# Altium PCB Lora_SensorNetworkNode_V0.1.PcbDoc
Units mm, origin at the board's own origin, x right, y up, seen from the top; angles counter-clockwise.
Board outline 91.95 x 56.9 mm, 2 copper layers (Top Layer, Bottom Layer); 40 components, 39 nets, 154 pads, 37 vias.
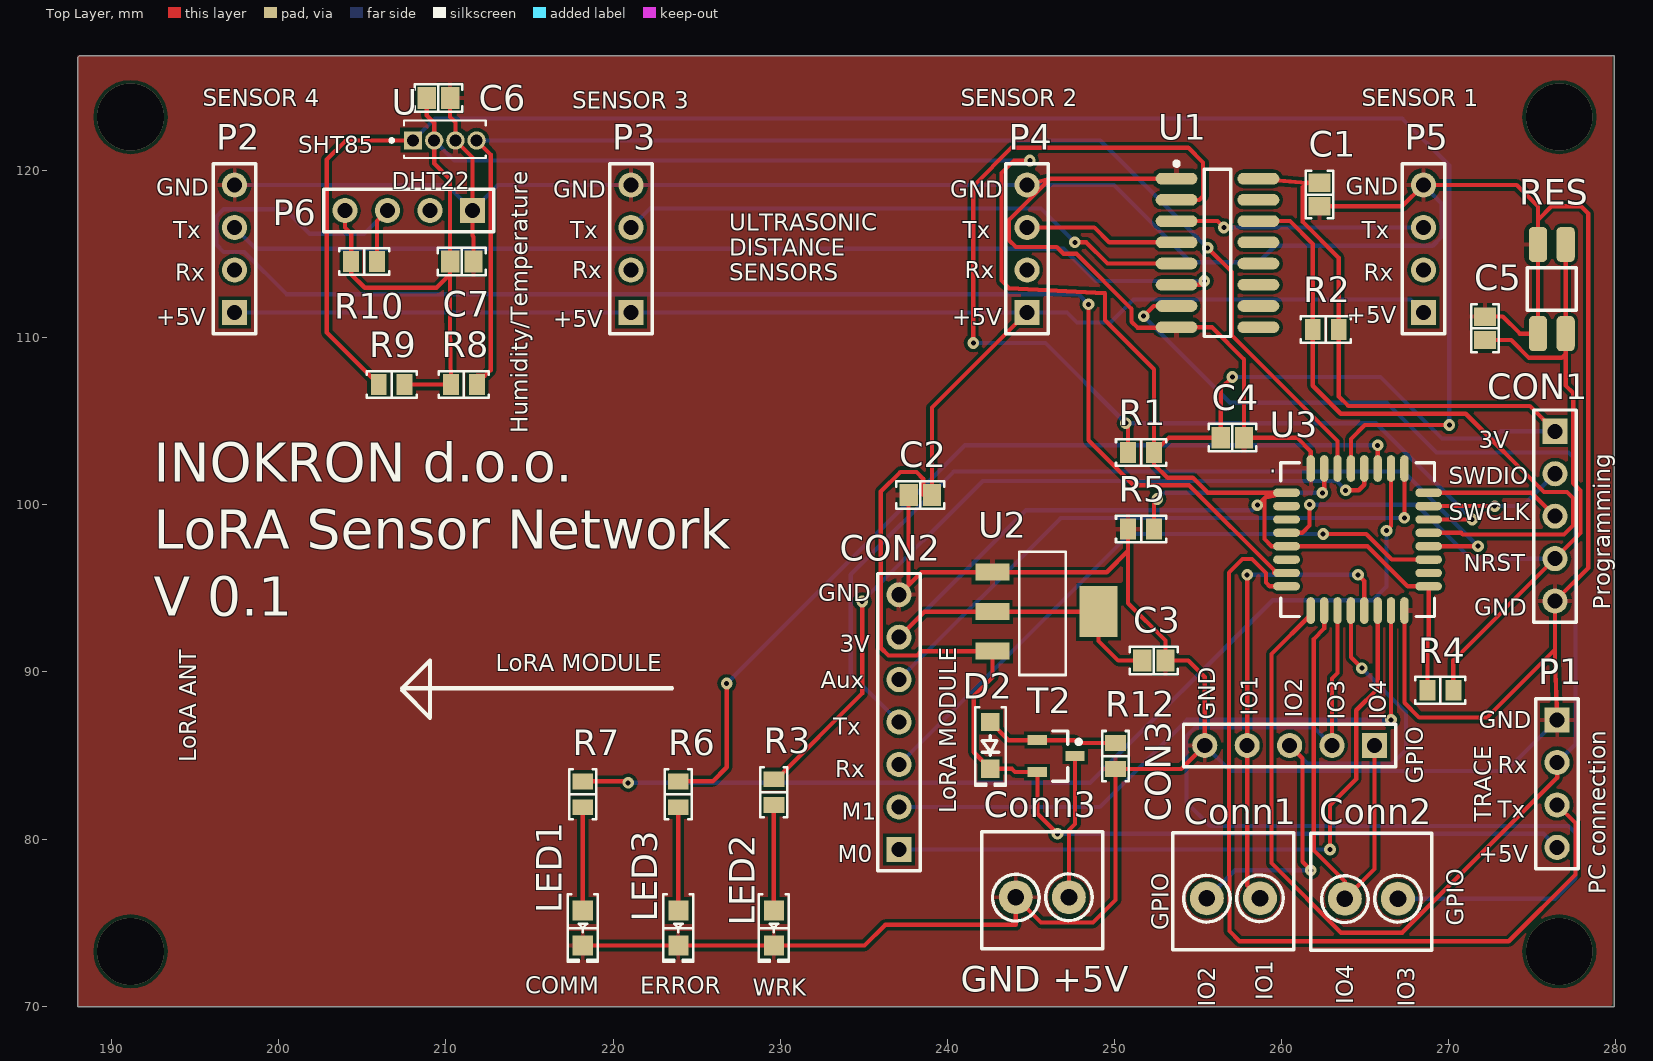
[diagram p0: Top Layer view]
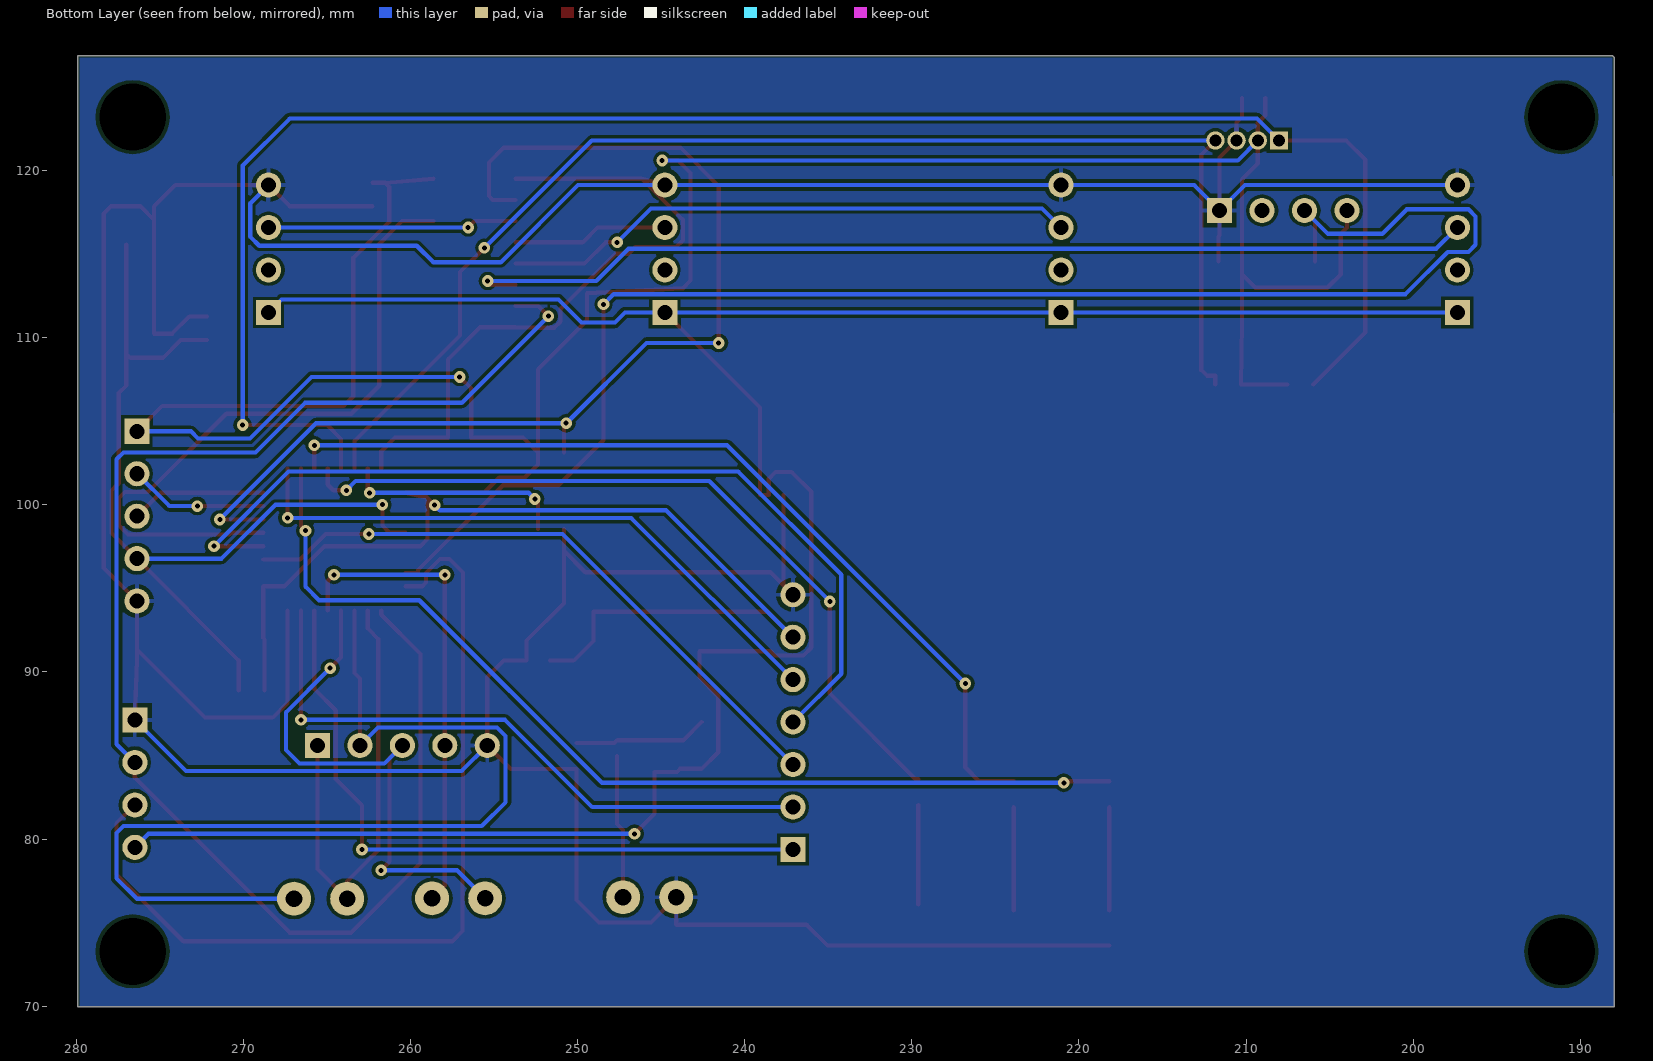
[diagram p1: Bottom Layer view, seen from below]
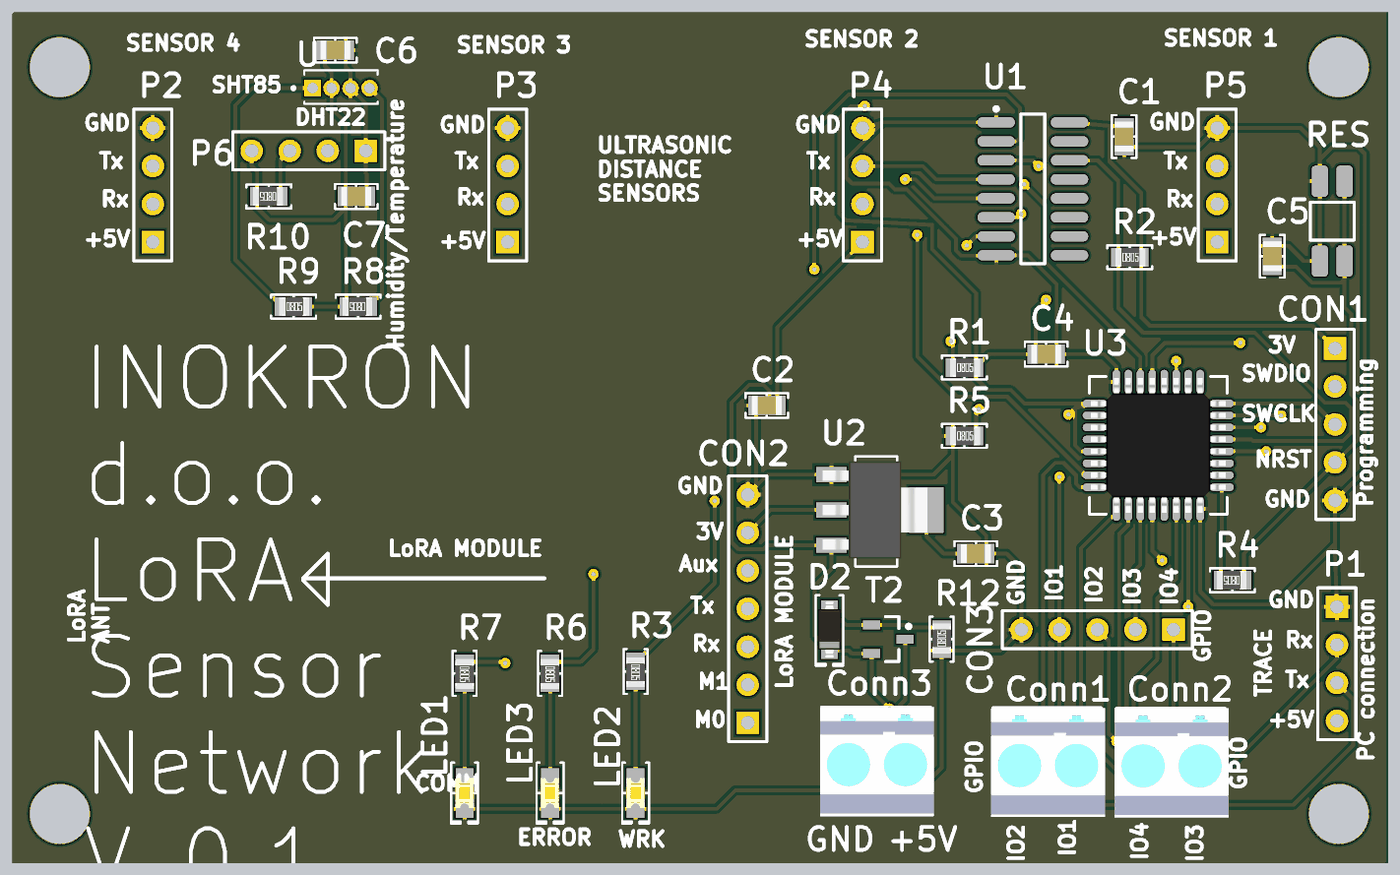
[diagram p2: 3D render of the assembled board from above, using the file's embedded part models]

## Layer stack, top to bottom
Top Solder: solder mask 0.0102, Solder Resist, Dk 3.5
Top Layer: signal copper 0.0356
Dielectric 1: dielectric 0.32, FR-4, Dk 4.8
Bottom Layer: signal copper 0.0356
Bottom Solder: solder mask 0.0102, Solder Resist, Dk 3.5

## Board outline
187.96,69.977 187.96,126.746 188.087,126.873 279.908,126.873 279.908,69.977

## Design rules (kind name [scope] priority, off if disabled: settings)
Clearance [All] p1: gap=0.2 ignorepadtopadclearanceinfootprint=FALSE
PolygonConnect [All] p1: connectstyle=Relief reliefconductorwidth=0.254 reliefentries=4 polygonreliefangle="90 Angle" airgapwidth=0.254
RoutingVias [All] p1: holewidth=0.3 width=0.7 viastyle="Through Hole" minholewidth=0.2 minwidth=0.6 maxholewidth=0.4 maxwidth=0.8
SolderMaskExpansion [All] p1: expansion=0.102
Width [All] p1: maxlimit=0.254 minlimit=0.2 preferedwidth=0.254 minimp=50.000000 maximp=50.000000 favimp=50.000000
30 further rules are at their usual default settings.

## Components (designator, comment, footprint, x,y, rotation, side; value= is the part's Value field where it differs from the comment)
C1 "0.1uF" "CAP 0805/2012 RF" 262.255,118.556 r90 top
C2 "0.1uF" "CAP 0805/2012 RF" 238.379,100.584 r0 top
C3 "0.1uF" "CAP 0805/2012 RF" 252.349,90.678 r180 top
C4 "0.1uF" "CAP 0805/2012 RF" 257.048,104.013 r180 top
C5 "0.1uF" "CAP 0805/2012 RF" 272.161,110.555 r270 top
C6 "0.1uF" "CAP 0805/2012 RF" 209.55,124.333 r180 top
C7 "0.1uF" "CAP 0805/2012 RF" 210.947,114.554 r180 top
CON1 "Header 2.54mm_5" HDR1X5 276.352,104.394 r270 top
CON2 "Header 2.54mm_7" HDR1X7 237.109,79.375 r90 top
CON3 "Header 2.54mm_5" HDR1X5 265.557,85.598 r180 top
Conn1 "GPIO 2" CON_TERM_BLOCK_31X2 255.27,76.429 r0 top value=IN1
Conn2 "GPIO 1" CON_TERM_BLOCK_31X2 263.525,76.403 r0 top value=IN1
Conn3 "+5V" CON_TERM_BLOCK_31X2 243.84,76.49 r0 top value=IN1
D2 "Diode Schottky" SOD-123W 242.57,85.598 r270 top
LED1 "Green" "LED 0805/2012 YELLOW" 218.186,74.676 r270 top
LED2 "Green" "LED 0805/2012 YELLOW" 229.616,74.676 r270 top
LED3 "Red" "LED 0805/2012 YELLOW" 223.901,74.676 r270 top
P1 "Header 4" HDR1X4 276.479,87.122 r270 top
P2 "Header 4" HDR1X4 197.358,111.506 r90 top
P3 "Header 4" HDR1X4 221.065,111.506 r90 top
P4 "Header 4" HDR1X4 244.771,111.506 r90 top
P5 "Header 4" HDR1X4 268.478,111.506 r90 top
P6 "Header 4" HDR1X4 211.582,117.602 r180 top
R1 "10K" "RES 0805/2012 RF" 251.587,103.124 r0 top
R2 "10K" "RES 0805/2012 RF" 262.636,110.49 r0 top
R3 "100" "RES 0805/2012 RF" 229.616,82.804 r270 top
R4 "10K" "RES 0805/2012 RF" 269.494,88.9 r180 top
R5 "10K" "RES 0805/2012 RF" 251.587,98.552 r0 top
R6 "100" "RES 0805/2012 RF" 223.901,82.677 r270 top
R7 "100" "RES 0805/2012 RF" 218.186,82.677 r270 top
R8 "10K" "RES 0805/2012 RF" 211.074,107.188 r180 top
R9 "10K" "RES 0805/2012 RF" 206.756,107.188 r0 top
R10 "10K" "RES 0805/2012 RF" 205.105,114.554 r180 top
R12 "100K 1%" "RES 0805/2012 RF" 250.063,84.963 r90 top
RES "TACTILE_SW_MICRO_CHINA" TACTILE_SW_2x3x4mm 277.495,113.03 r0 top
T2 "MOSFET P-CH SI2302CDS-T1-BE3" SOT23 246.507,84.963 r0 top
U "SHT85" XDCR_SHT85 209.931,121.793 r0 top
U1 "SN74HC153D" SO-16_m 256.159,115.062 r0 top
U2 "LD1117S50TR" SOT-223 245.872,93.599 r180 top
U3 "STM32F051K8Tx" TQFP_32pin 264.541,97.917 r0 top

## Footprints (in the part's own frame and the unit in brackets; to place one, negate y for a bottom-side part, rotate by r counter-clockwise, add the part's x,y. Pads: shape width x height; smd on the part's side, far side on the other; paste and mask are expansions set on the pad)
"CAP 0805/2012 RF" [mm] "Chip Capacitor, 2-Leads, Body 2.00x1.20mm, IPC High Density"
  rect 1.1x1.3 smd: 1(-0.7,0) 2(0.7,0)
  silkscreen extent -1.43,-0.82 1.43,0.82, body extent -1,-0.64 1,0.64, height 1.26
CON_TERM_BLOCK_31X2 [mil] "TerminalBlock 2way 3.1mm"
  round 80 hole 39.37: 1(10,0.99) 2(135,0.99)
  silkscreen extent -70,-120 215,155, body extent -75,-132 225,155, height 335
HDR1X4 [mm] "Connector; Header; 4 Position"
  rect 1.5x1.5 hole 0.9: 1(0,0)
  round 1.5 hole 0.9: 2(2.54,0) 3(5.08,0) 4(7.62,0)
  silkscreen extent -1.27,-1.27 8.89,1.27
HDR1X5 [mm] "Connector; Header; 5 Position"
  rect 1.5x1.5 hole 0.9: 1(0,0)
  round 1.5 hole 0.9: 2(2.54,0) 3(5.08,0) 4(7.62,0) 5(10.16,0)
  silkscreen extent -1.27,-1.27 11.43,1.27
HDR1X7 [mm] "Connector; Header; 7 Position"
  rect 1.5x1.5 hole 0.9: 1(0,0)
  round 1.5 hole 0.9: 2(2.54,0) 3(5.08,0) 4(7.62,0) 5(10.16,0) 6(12.7,0) 7(15.24,0)
  silkscreen extent -1.27,-1.27 16.51,1.27
"LED 0805/2012 YELLOW" [mm] "Chip Diode, 2-Leads, Body 2.00x1.25mm, IPC Medium Density"
  rect 1.2x1.2 smd: 1(-1.05,0) 2(1.05,0)
  silkscreen extent -2.03,-0.9 2.03,0.9, body extent -1,-0.62 1,0.63, height 0.9
"RES 0805/2012 RF" [mm] "Chip Resistor, 2-Leads, Body 2.00x1.25mm, IPC High Density"
  rect 0.95x1.25 smd: 1(-0.775,0) 2(0.775,0)
  silkscreen extent -1.5,-0.8 1.5,0.8, body extent -0.95,-0.62 1.05,0.63, height 0.6
SO-16_m [mm] "SOIC, 16-Leads, Body 9.9x3.9mm, Pitch 1.27mm, IPC Low Density"
  oval 2.5x0.7 smd: 1(-2.45,4.445) 2(-2.45,3.175) 3(-2.45,1.905) 4(-2.45,0.635) 5(-2.45,-0.635) 6(-2.45,-1.905) 7(-2.45,-3.175) 8(-2.45,-4.445) 9(2.45,-4.445) 10(2.45,-3.175) 11(2.45,-1.905) 12(2.45,-0.635) 13(2.45,0.635) 14(2.45,1.905) 15(2.45,3.175) 16(2.45,4.445)
  silkscreen extent -2.57,-5 0.8,5.47, body extent -2,-5 2,5, height 1.75
SOD-123W [mm] "SOD-123W, 2-Leads, Body 1.90x3.70mm, IPC Medium Density"
  rect 1.1x1.1 smd: 1(1.4,0)
  rect 1.1x1.1 smd paste+0: 2(-1.4,0)
  silkscreen extent -2.3,-0.92 2.41,0.92, body extent -1.86,-0.78 1.86,0.77, height 1.35
SOT23 [mm] "SOT23, 3-Leads, Body 2.9x1.3mm, Pitch 0.95mm, Lead Span 2.3mm - Reverse Pinning, IPC Medium Density"
  rect 1.15x0.6 smd: 1(-1.125,0.95) 2(-1.125,-0.95) 3(1.125,0)
  silkscreen extent -0.2,-1.5 1.48,1.5, body extent -0.7,-1.5 0.7,1.5, height 1.1
SOT-223 [mil]
  rect 80x40 smd: 1(125,-93) 2(125,0) 3(125,93)
  rect 90x120 smd: 4(-125,0)
  silkscreen extent -48,-141 62,149, body extent -128,-128 148,128, height 65
TACTILE_SW_2x3x4mm [mil]
  rrect50% 43x82.68 smd: 1(-85,100) 2(-20,100) 3(-85,-110) 4(-20,-110)
  silkscreen extent -110,-55 5,45
TQFP_32pin [mm]
  oval 1.6x0.5 smd: 1(-4.25,2.8) 2(-4.25,2) 3(-4.25,1.2) 4(-4.25,0.4) 5(-4.25,-0.4) 6(-4.25,-1.2) 7(-4.25,-2) 8(-4.25,-2.8) 17(4.25,-2.8) 18(4.25,-2) 19(4.25,-1.2) 20(4.25,-0.4) 21(4.25,0.4) 22(4.25,1.2) 23(4.25,2) 24(4.25,2.8)
  oval 0.5x1.6 smd: 9(-2.8,-4.25) 10(-2,-4.25) 11(-1.2,-4.25) 12(-0.4,-4.25) 13(0.4,-4.25) 14(1.2,-4.25) 15(2,-4.25) 16(2.8,-4.25) 25(2.8,4.25) 26(2,4.25) 27(1.2,4.25) 28(0.4,4.25) 29(-0.4,4.25) 30(-1.2,4.25) 31(-2,4.25) 32(-2.8,4.25)
  silkscreen extent -4.6,-4.6 4.6,4.6, body extent -4.5,-4.5 4.5,4.5, height 1.45
XDCR_SHT85 [mm]
  rect 1.1x1.1 hole 0.72: 1(-1.905,0)
  round 1.1 hole 0.72: 2(-0.635,0) 3(0.635,0) 4(1.905,0)
  silkscreen extent -3.27,-1.05 2.45,1.2

## Part data
C1 C2 C3 C4 C5 C6 C7: library part Capacitor, "SMT Capacitor"
CON1 CON3: "Header, 5-Pin", LatestRevisionDate=17-Jul-2002, LatestRevisionNote="Re-released for DXP Platform.", Publisher="Altium Limited"
CON2: "Header, 7-Pin", LatestRevisionDate=17-Jul-2002, LatestRevisionNote="Re-released for DXP Platform.", Publisher="Altium Limited"
Conn1 Conn2 Conn3: "Terminal Block(Aliexpress) THT 3.1 2-pin", Part Number=TERMINAL_BLOCK_381X2, ConfirmedBy=OLD, CreatedBy=OLD, Farnell=2007985, Lib Main=Connectors, Lib Sub1=TerminalBlock, MountingType=THT, MULTICOMP=MC000018, RD_IDENT=RD00078, RLS IDENT=---, STATE=R&D
D2: "Schottky Diode", Manufacturer_Name=Nexperia, Manufacturer_Part_Number=PMEG6010ELRX, Datasheet Link=https://assets.nexperia.com/documents/data-sheet/PMEG6010ELR.pdf, mouser=https://eu.mouser.com/ProductDetail/Nexperia/PMEG6010ELRX?qs=Yna0arPQ0CTfJYBa%252B8ef6A%3D%3D, Price_1000=0,09700
LED1 LED2 LED3: library part LED, "Chip LED"
P1 P2 P3 P4 P5 P6: "Header, 4-Pin", LatestRevisionDate=17-Jul-2002, LatestRevisionNote="Re-released for DXP Platform.", Publisher="Altium Limited"
R1 R2 R3 R4 R5 R6 R7 R8 R9 R10 R12: library part Resistor, "SMT Resistor"
RES: "TEILE/LOS 3*4*2mm SMD Schalter 4 Pin Touch Micro Switch Tact Push Button", Farnell=Aliexpress, Manufacture=https://de.aliexpress.com/item/4001125176759.html?spm=a2g0o.cart.0.0.757d38daiRADTA&mp=1&gatewayAdapt=glo2deu
T2: library part "MOSFET P-CH", "MOSFET P-CH", mouser=https://eu.mouser.com/ProductDetail/Vishay-Siliconix/SI2302CDS-T1-BE3?qs=CiayqK2gdcKmknxSqRbb7w%3D%3D
U: "Humidity Temperature Sensor 0 ~ 100% RH Digital ±1.5% RH 8s Through Hole", Package="SIP-4 Sensirion AG", Digi-Key_Part_Number=1649-1110-ND, Digi-Key_Purchase_URL=https://www.digikey.com/product-detail/en/sensirion-ag/SHT85/1649-1110-ND/9666378?utm_source=snapeda&utm_medium=aggregator&utm_campaign=symbol, MF="Sensirion AG", MP=SHT85, SnapEDA_Link=https://www.snapeda.com/parts/SHT85/Sensirion%20AG/view-part/3601545/?ref=snap
U1: "Dual 4-Line To 1-Line Data Selectors/Multiplexers 16-SOIC -40 to 85", Manufacturer_Name="Texas Instruments", Copyright="Copyright (C) 2025 Ultra Librarian. All rights reserved.", Datasheet=https://www.ti.com/lit/gpn/sn74hc153, Manufacturer_Part_Number=SN74HC153D, RefDes=RefDes, Type=Type
U2: library part LD1117, "LDO voltage regulator"
U3: "ARM Microcontrollers - MCU Ultra-low-power ARM Cortex-M0+ MCU with 16-Kbytes Flash, 32 MHz CPU", Manufacturer_Name=STMicroelectronics, Manufacturer_Part_Number=STM32F051K8Tx, Price_1=1,80000, Price_1000=0,88600

## Via types
v1: diameter 0.7, hole 0.3, Top Layer to Bottom Layer, 33 vias
v2: diameter 4/1.27 (per signal layer), hole 4, Top Layer to Bottom Layer, 4 vias

## Nets (pads, with @x,y where several pads share a name; then routed paths per layer and width w, separated by ;. In a path a pad name is that pad's centre, name@x,y a point inside that pad or via, vN(x,y) a via of type N, cw(c..) or ccw(c..) an arc to the next point about the centre after c; other vN are vias at no path point)
5V: C2.2 D2.1 P1.4 P2.1 P3.1 P4.1 P5.1 T2.2 U2.3 | length 151.8
  Top Layer w0.254: P4.1 239.079,105.814 C2.2 238.557,100.584 238.557,101.549 238.15,101.956 237.185,101.956 236.017,100.787 236.017,91.44 236.474,90.983 238.176,90.983 238.43,91.237 U2.3 242.697,89.662 241.579,88.544 241.579,85.189 D2.1 243.865,84.198 244.05,84.013 T2.2 245.389,84.013 245.389,81.509 v1(246.583,80.315)
  Bottom Layer w0.254: P2.1 P3.1 P4.1 247.16,111.506 247.76,110.905 249.759,110.905 251.139,112.285 267.699,112.285 P5.1 ; v1(246.583,80.315) 275.666,80.315 P1.4
AUX: CON2.5 U3.25 | length 37.2
  Top Layer w0.254: v1(267.341,99.212) U3.25
  Bottom Layer w0.254: CON2.5 246.786,99.212 v1(267.341,99.212)
GND: C1.1 C2.1 C3.1 C4.1 C5.1 C6.1 C7.1 CON1.5 CON2.7 CON3.5 Conn3.1 LED1.2 LED2.2 LED3.2 P1.1 P2.4 P3.4 P4.4 P5.4 P6.1 R5.1 R12.1 RES.1 RES.3 U1.1 U1.8 U2.1 U3.16 U3.32 U.3 | length 315.5
  Top Layer w0.254: C6.1 210.25,123.201 210.566,122.885 U.3 211.582,120.777 P6.1 211.582,116.092 211.647,116.027 C7.1 ; LED1.2 LED3.2 LED2.2 235.043,73.626 236.282,74.865 244.094,74.865 Conn3.1 245.603,75.006 248.717,75.006 250.063,76.352 R12.1 253.987,84.188 CON3.5 255.397,89.687 254.406,90.678 C3.1 253.049,91.872 250.812,94.109 250.812,97.244 ; CON2.7 237.679,95.185 ; C2.1 237.679,95.185 ; P4.4 246.151,119.507 ; R5.1 250.812,97.244 ; U1.1 246.151,119.507 ; U3.32 261.741,103.181 260.909,104.013 C4.1 257.748,108.698 255.829,110.617 U1.8 252.458,110.594 251.371,110.594 251.018,110.947 251.018,111.72 247.723,115.014 246.946,115.014 246.543,115.418 244.094,115.418 243.688,115.824 243.688,117.043 246.151,119.507 ; C1.1 267.208,117.856 P5.4 274.066,119.126 275.336,117.856 275.336,117.043 ; U3.16 267.341,88.157 268.224,87.274 272.288,87.274 276.352,91.338 ; C5.1 273.228,111.255 274.247,110.236 RES.3 RES.1 275.336,117.043 ; P1.1 276.352,90.729 276.352,91.338 ; 237.679,95.185 238.455,95.961 U2.1 249.53,95.961 250.812,97.244 ; 275.336,117.043 276.149,117.856 277.901,117.856 278.337,117.42 278.337,96.219 CON1.5 276.352,91.338
  Bottom Layer w0.254: P2.4 210.058,119.126 P6.1 213.106,119.126 P3.4 P4.4 249.961,119.126 254.584,114.503 258.623,114.503 259.613,115.494 269.037,115.494 269.57,116.027 269.57,118.034 P5.4 ; CON3.5 256.928,84.067 273.424,84.067 P1.1
M0: CON2.1 U3.14 | length 41.3
  Top Layer w0.254: v1(262.89,79.375) 262.89,82.017 264.465,83.591 264.465,87.7 265.741,88.976 U3.14
  Bottom Layer w0.254: CON2.1 v1(262.89,79.375)
M1: CON2.2 U3.15 | length 38.1
  Top Layer w0.254: v1(266.541,87.129) U3.15
  Bottom Layer w0.254: CON2.2 249.12,81.915 254.334,87.129 v1(266.541,87.129)
MPX_select_1: R2.1 U1.14 U3.21 | length 41.2
  Top Layer w0.254: U1.14 260.489,116.967 261.861,115.595 R2.1 261.861,107.118 263.534,105.446 271.008,105.446 275.692,100.762 277.073,100.762 277.429,100.406 277.429,98.755 276.896,98.222 270.834,98.222 270.739,98.317 U3.21
MPX_select_2: R1.1 U1.2 U3.22 | length 66.8
  Top Layer w0.254: v1(241.554,109.677) 241.554,119.075 243.84,121.361 254.406,121.361 255.295,120.472 255.295,118.466 255.067,118.237 U1.2 ; v1(250.673,104.877) 250.812,104.737 R1.1 ; U3.22 v1(271.399,99.117)
  Bottom Layer w0.254: v1(241.554,109.677) 245.872,109.677 v1(250.673,104.877) 265.639,104.877 v1(271.399,99.117)
NetCON3_1: CON3.1 Conn2.1 U3.10 | length 28.2
  Top Layer w0.254: U3.10 262.541,92.59 261.925,91.973 261.925,79.313 263.779,77.459 Conn2.1 265.557,78.207 CON3.1
NetCON3_2: CON3.2 Conn2.2 U3.11 | length 59.4
  Top Layer w0.254: CON3.2 263.017,89.611 263.341,89.935 U3.11
  Bottom Layer w0.254: CON3.2 261.94,86.675 254.813,86.675 254.305,86.167 254.305,82.194 255.727,80.772 277.165,80.772 277.571,80.366 277.571,77.648 276.352,76.429 Conn2.2
NetCON3_3: CON3.3 Conn1.1 U3.12 | length 32.4
  Top Layer w0.254: CON3.3 261.239,84.836 261.239,78.638 v1(261.747,78.13) ; U3.12 264.141,90.875 v1(264.795,90.221)
  Bottom Layer w0.254: Conn1.1 257.2,78.13 v1(261.747,78.13) ; CON3.3 261.554,84.521 266.634,84.521 267.437,85.324 267.437,87.579 v1(264.795,90.221)
NetCON3_4: CON3.4 Conn1.2 U3.13 | length 28.6
  Top Layer w0.254: v1(257.937,95.809) CON3.4 257.937,77.216 Conn1.2 ; v1(264.566,95.809) 264.941,95.434 U3.13
  Bottom Layer w0.254: v1(257.937,95.809) v1(264.566,95.809)
NetConn3_2: Conn3.2 T2.3 | length 8.6
  Top Layer w0.254: Conn3.2 247.269,80.543 247.632,80.906 T2.3
NetD2_2: D2.2 R12.2 T2.1 | length 8
  Top Layer w0.254: D2.2 243.655,85.913 T2.1 247.625,85.913 247.8,85.738 R12.2
NetLED1_1: LED1.1 R7.2 | length 6.2
  Top Layer w0.254: LED1.1 R7.2
NetLED2_1: LED2.1 R3.2 | length 5.9
  Top Layer w0.254: LED2.1@229.616,76.082 R3.2
NetLED3_1: LED3.1 R6.2 | length 6.2
  Top Layer w0.254: LED3.1 R6.2
NetP6_3: P6.3 R10.1 U3.7 | length 93.6
  Top Layer w0.254: R10.1 205.88,116.98 P6.3 ; v1(248.437,111.989) 248.437,103.861 251.133,101.165 254.46,101.165 259.537,96.088 259.537,95.917 U3.7
  Bottom Layer w0.254: P6.3 205.105,116.205 201.854,116.205 200.381,117.678 196.698,117.678 196.266,117.246 196.266,115.555 196.698,115.123 197.932,115.123 200.457,112.598 247.828,112.598 v1(248.437,111.989)
NetR3_1: R3.1 U3.28 | length 47.3
  Top Layer w0.254: R3.1 229.768,83.579 234.899,88.71 v1(234.899,94.209) ; v1(263.83,100.863) 264.611,100.863 264.941,101.194 U3.28
  Bottom Layer w0.254: v1(234.899,94.209) 242.113,101.422 263.271,101.422 v1(263.83,100.863)
NetR5_2: R5.2 U3.31 | length 13.4
  Top Layer w0.254: R5.2 252.362,100.155 v1(252.552,100.345) ; v1(262.433,100.711) 262.541,100.819 U3.31
  Bottom Layer w0.254: v1(252.552,100.345) 252.918,100.711 v1(262.433,100.711)
NetR6_1: R6.1 U3.27 | length 54.5
  Top Layer w0.254: R6.1 225.958,83.452 226.797,84.29 v1(226.797,89.306) ; U3.27 v1(265.741,103.556)
  Bottom Layer w0.254: v1(226.797,89.306) 241.046,103.556 v1(265.741,103.556)
NetR7_1: R7.1 U3.26 | length 60.2
  Top Layer w0.254: R7.1 220.815,83.452 v1(220.904,83.363) ; v1(266.268,98.45) 266.541,98.723 U3.26
  Bottom Layer w0.254: v1(220.904,83.363) 248.539,83.363 259.461,94.285 265.455,94.285 266.268,95.098 v1(266.268,98.45)
NRST: C5.2 CON1.4 R4.1 RES.2 RES.4 U3.4 | length 54.4
  Top Layer w0.254: U3.4 261.233,98.317 261.671,98.755 v1(261.671,100) ; R4.1 270.269,90.691 CON1.4 277.883,98.305 277.883,100.845 277.444,101.284 277.444,106.68 276.987,107.137 276.987,109.017 ; C5.2 273.736,109.855 274.803,108.788 276.758,108.788 276.987,109.017 ; RES.2 RES.4 276.987,109.017
  Bottom Layer w0.254: v1(261.671,100) 268.072,100 271.297,96.774 CON1.4
RX_1: P2.2
RX_2: P3.2
RX_3: P4.2
RX_4: P5.2
RXD: CON2.3 U3.19 | length 38
  Top Layer w0.254: v1(262.484,98.247) 265.058,98.247 266.588,96.717 U3.19
  Bottom Layer w0.254: CON2.3 250.901,98.247 v1(262.484,98.247)
SCL: R9.1 U3.29 U.1 | length 107.6
  Top Layer w0.254: R9.1 202.87,110.299 202.87,120.65 204.013,121.793 U.1 ; U3.29 264.141,103.937 264.973,104.769 v1(270.027,104.769)
  Bottom Layer w0.254: U.1 209.347,123.114 267.208,123.114 270.027,120.294 v1(270.027,104.769)
SDA: R8.1 U3.30 U.4 | length 78.4
  Top Layer w0.254: U.4 212.674,120.955 212.674,108.052 212.344,107.721 211.849,107.721 R8.1 ; v1(255.575,115.367) 257.023,113.919 257.023,110.134 263.341,103.816 U3.30
  Bottom Layer w0.254: U.4 249.149,121.793 v1(255.575,115.367)
SWCLK: CON1.3 U3.24 | length 8.1
  Top Layer w0.254: U3.24 274.949,100.717 CON1.3
SWDIO: CON1.2 U3.23 | length 8.4
  Top Layer w0.254: U3.23 v1(272.745,99.917)
  Bottom Layer w0.254: v1(272.745,99.917) 274.415,99.917 CON1.2
TX_1: P2.3 U1.6 | length 61.1
  Top Layer w0.254: U1.6 255.143,113.157 v1(255.372,113.386)
  Bottom Layer w0.254: P2.3 198.628,115.316 246.946,115.316 248.876,113.386 v1(255.372,113.386)
TX_2: P3.3 U1.5 | length 34.5
  Top Layer w0.254: v1(247.625,115.697) 248.31,115.697 249.58,114.427 U1.5
  Bottom Layer w0.254: P3.3 222.208,117.729 245.593,117.729 v1(247.625,115.697)
TX_3: P4.3 U1.4 | length 9.3
  Top Layer w0.254: P4.3 248.793,116.586 249.682,115.697 U1.4
TX_4: P5.3 U1.3 | length 14.9
  Top Layer w0.254: U1.3 256.159,116.967 v1(256.54,116.586)
  Bottom Layer w0.254: v1(256.54,116.586) P5.3
USART1_RX: CON2.4 U3.20 | length 54.9
  Top Layer w0.254: U3.20 v1(271.748,97.517)
  Bottom Layer w0.254: CON2.4 234.213,89.891 234.213,95.809 240.386,101.981 267.284,101.981 v1(271.748,97.517)
USART2_RX: P1.2 U1.7 U3.9 | length 89.8
  Top Layer w0.254: v1(251.739,111.277) 252.349,111.887 U1.7 ; U3.9 261.741,93.421 259.385,91.065 259.385,78.562 263.55,74.397 267.208,74.397 276.479,83.668 P1.2
  Bottom Layer w0.254: v1(251.739,111.277) 256.921,106.096 266.294,106.096 269.265,103.124 277.165,103.124 277.571,102.718 277.571,85.674 P1.2
USART2_TX: P1.3 U3.8 | length 53.5
  Top Layer w0.254: U3.8 259.283,95.117 259.055,95.346 259.055,95.91 258.216,96.749 257.658,96.749 256.845,95.936 256.845,77.826 256.87,77.8 256.87,74.498 257.48,73.889 273.583,73.889 277.571,77.876 277.571,80.95 P1.3
Vcc: C1.2 C3.2 C4.2 C6.2 C7.2 CON1.1 CON2.6 P6.4 R1.2 R2.2 R4.2 R8.2 R9.2 R10.2 U1.16 U2.2 U2.4 U3.1 U3.5 U3.17 U.2 | length 227.6
  Top Layer w0.254: P6.4 203.962,116.59 204.33,116.222 R10.2 204.33,113.792 205.143,112.979 209.434,112.979 210.247,113.792 ; R9.2 R8.2 210.247,110.872 210.247,113.792 ; C6.2 208.85,123.28 209.296,122.834 U.2 209.296,120.421 210.247,119.47 C7.2 210.247,113.792 ; CON2.6 238.633,93.599 U2.2 U2.4 249.047,91.846 250.215,90.678 C3.2 ; v1(244.932,120.599) 243.989,120.599 243.23,119.84 243.23,113.411 243.688,112.954 249.428,112.649 249.428,111.036 252.362,108.102 R1.2 ; v1(257.048,107.645) 256.348,106.945 C4.2 253.251,104.013 R1.2 ; v1(258.541,99.974) 258.972,100.406 ; U1.16 261.512,119.249 ; R4.2 268.719,91.948 268.791,92.02 U3.17 267.537,95.117 265.137,97.517 U3.5 259.397,97.517 258.972,97.942 258.972,100.406 ; CON1.1 274.846,105.9 263.988,105.9 263.411,106.477 R2.2 263.411,114.77 261.264,116.916 261.264,119.002 261.512,119.249 ; R1.2 252.362,102.413 253.156,101.619 254.679,101.619 255.581,100.717 259.283,100.717 ; 258.972,100.406 259.283,100.717 ; 258.972,100.406 U3.1 259.283,100.717 ; 261.512,119.249 261.518,119.256 C1.2 261.512,119.249
  Bottom Layer w0.254: U.2 210.49,120.599 v1(244.932,120.599) ; CON2.6 244.702,99.668 258.234,99.668 v1(258.541,99.974) ; v1(257.048,107.645) 265.913,107.645 269.596,103.962 272.694,103.962 273.126,104.394 CON1.1
pads on no net: P6.2 U1.9 U1.10 U1.11 U1.12 U1.13 U1.15 U3.2 U3.3 U3.6 U3.18
copper on no net:
  other v2: 191.135,73.279 276.606,73.279 191.135,123.19 276.606,123.19

## Polygon pours and split planes (outlines as drawn)
GND on Top Layer (solid, pour order 0): 187.96,126.873 279.781,126.873 279.781,70.104 279.654,69.977 187.96,69.977
GND on Bottom Layer (solid, pour order 2): 188.087,126.746 279.781,126.746 279.781,69.977 187.96,69.977

## Silkscreen, mask and mechanical layers (free items; w line width, h text height)
Top Overlay:
  lines w0.254: 207.391,89.027 209.042,90.678 209.042,87.249 207.391,88.9 207.518,89.027 223.52,89.027
  text "SENSOR 4" at 195.453,123.825 h1
  text "SENSOR 2" at 240.792,123.825 h1
  text "SENSOR 1" at 264.795,123.825 h1
  text "SENSOR 3" at 217.551,123.698 h1
  text "SHT85" at 201.168,121.031 h1
  text "DHT22" at 206.756,118.872 h1
  text "GND" at 263.83,118.556 h1
  text "GND" at 192.659,118.491 h1
  text "GND" at 216.408,118.364 h1
  text "GND" at 240.157,118.364 h1
  text "Tx" at 193.675,115.951 h1
  text "Tx" at 217.424,115.951 h1
  text "Tx" at 240.919,115.951 h1
  text "Tx" at 264.795,115.951 h1
  text "Rx" at 217.551,113.538 h1
  text "Rx" at 241.046,113.538 h1
  text "Rx" at 193.802,113.411 h1
  text "Rx" at 264.922,113.411 h1
  text "ULTRASONIC / DISTANCE / SENSORS" at 226.949,113.386 h1
  text "+5V" at 263.906,110.871 h1
  text "+5V" at 192.659,110.744 h1
  text "+5V" at 240.284,110.744 h1
  text "+5V" at 216.408,110.617 h1
  text "Humidity/Temperature" at 214.884,104.267 h1 r90
  text "3V" at 271.78,103.378 h1
  text "SWDIO" at 270.002,101.219 h1
  text "SWCLK" at 270.002,99.06 h1
  text "NRST" at 270.891,96.012 h1
  text "GND" at 232.283,94.234 h1
  text "Programming" at 279.654,93.726 h1 r90
  text "GND" at 271.526,93.345 h1
  text "INOKRON d.o.o. / LoRA Sensor Network / V 0.1" at 192.532,92.583 h4
  text "3V" at 233.553,91.178 h1
  text "LoRA MODULE" at 212.979,90.043 h1
  text "Aux" at 232.41,89.027 h1
  text "IO1" at 258.572,87.376 h1 r90
  text "IO2" at 261.239,87.249 h1 r90
  text "GND" at 256.032,87.122 h1 r90
  text "IO3" at 263.779,87.129 h1 r90
  text "IO4" at 266.268,87.129 h1 r90
  text "GND" at 271.78,86.614 h1
  text "Tx" at 233.172,86.233 h1
  text "LoRA ANT" at 195.072,84.582 h1 r90
  text "Rx" at 272.923,83.947 h1
  text "Rx" at 233.299,83.693 h1
  text "GPIO" at 268.478,83.312 h1 r90
  text "LoRA MODULE" at 240.538,81.534 h1 r90
  text "Tx" at 272.923,81.28 h1
  text "M1" at 233.68,81.153 h1
  text "TRACE" at 272.542,81.026 h1 r90
  text "M0" at 233.426,78.613 h1
  text "+5V" at 271.78,78.613 h1
  text "PC connection" at 279.4,76.708 h1 r90
  text "GPIO" at 270.891,74.803 h1 r90
  text "GPIO" at 253.238,74.549 h1 r90
  text "GND" at 240.792,70.866 h1.52
  text "+5V" at 246.307,70.866 h1.52
  text "COMM" at 214.757,70.739 h1
  text "ERROR" at 221.615,70.739 h1
  text "WRK" at 228.346,70.612 h1
  text "IO1" at 259.461,70.358 h1 r90
  text "IO4" at 264.287,70.104 h1 r90
  text "IO2" at 256.032,69.977 h1 r90
  text "IO3" at 267.97,69.977 h1 r90
Mechanical 1:
  the board outline again, w0.254

## Text inside footprints (layer, text, board x,y; h text height)
U3: Mechanical 11 "1" at 260.316,100.792 h0.5 r270